# Altium PCB BB-18 Control Board.PcbDoc (part 1 of 2)
Units mil, origin at the board's own origin, x right, y up, seen from the top; angles counter-clockwise.
Board outline 5999.87 x 5500 mil, 2 copper layers (Top Layer, Bottom Layer); 86 components, 72 nets, 393 pads, 7 vias.
Unrouted connection lines stored in the file: 230.
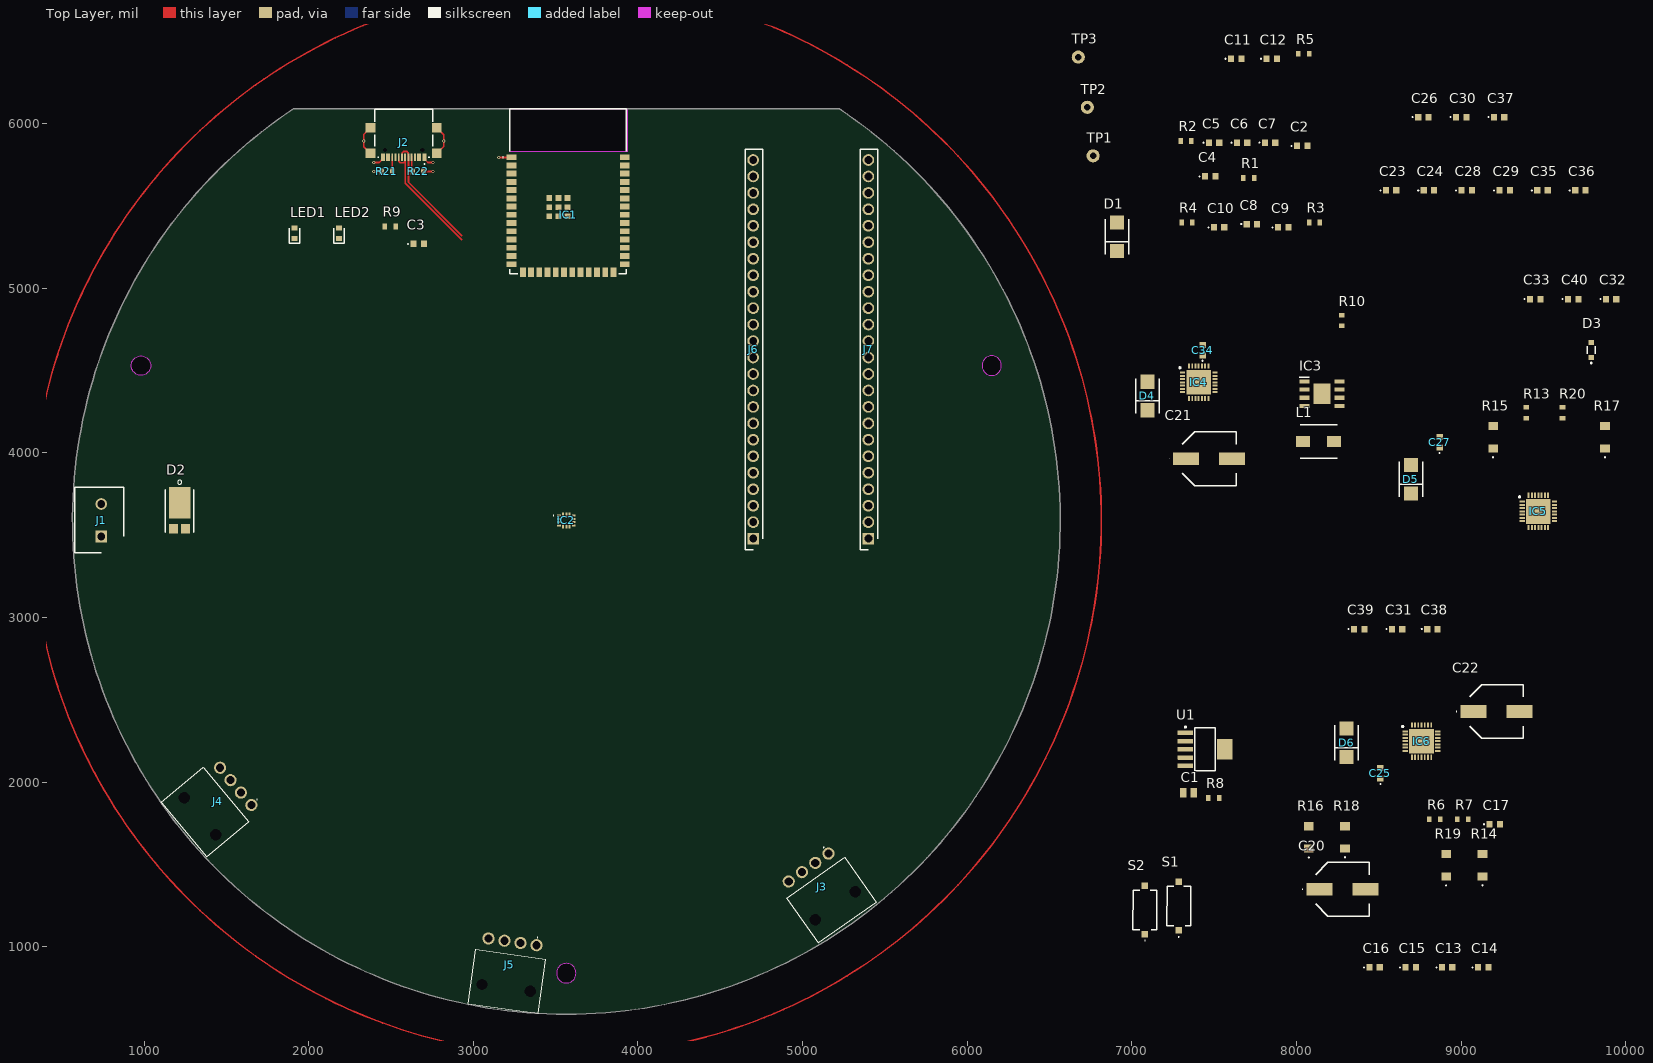
[diagram p0: Top Layer view]
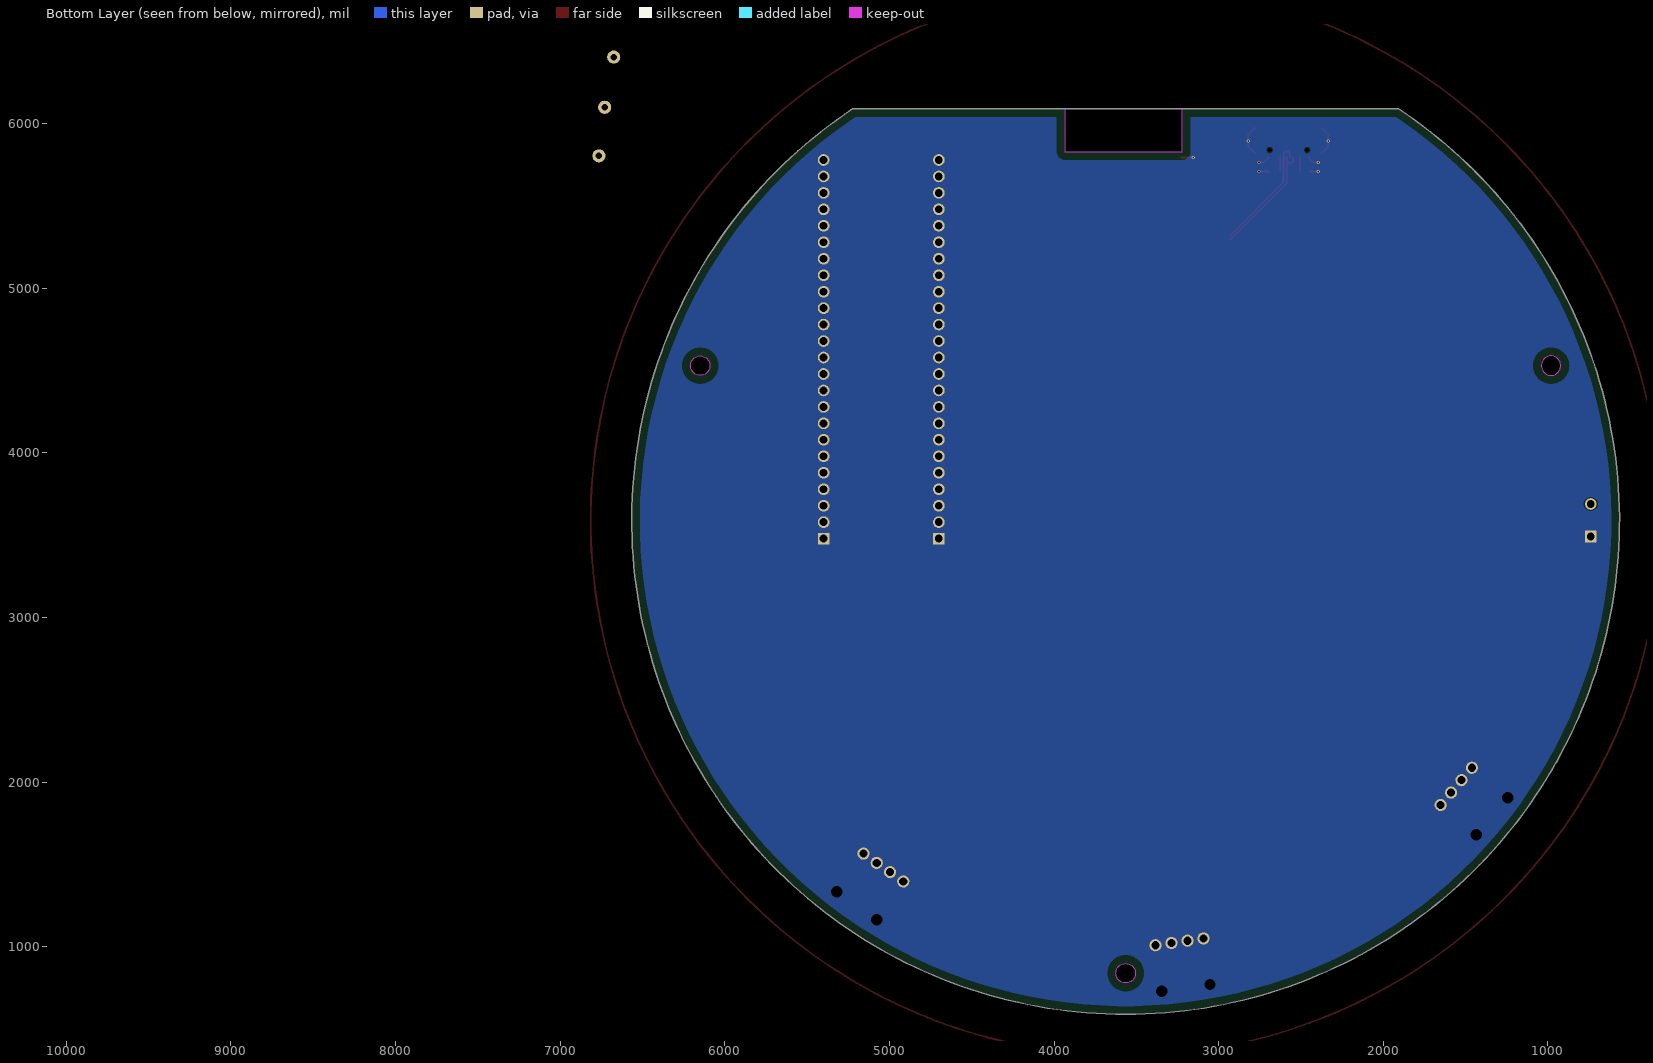
[diagram p1: Bottom Layer view, seen from below]

## Layer stack, top to bottom
Top Solder: solder mask 0.4, Solder Resist, Dk 3.5
Top Layer: signal copper 1.4
Dielectric 1: dielectric 12.6, FR-4, Dk 4.8
Bottom Layer: signal copper 1.4
Bottom Solder: solder mask 0.4, Solder Resist, Dk 3.5

## Board outline
1906.94,6090.25 ccw(c3565.25,3590.25) 5223.56,6090.25
cut-out: 6090.35,4530.81 ccw(c6149.4,4530.81) 6149.4,4471.75 ccw(c6149.4,4530.81) 6208.46,4530.81 ccw(c6149.4,4530.81) 6149.4,4589.86 ccw(c6149.4,4530.81)
cut-out: 3506.19,840.25 ccw(c3565.25,840.25) 3565.25,781.19 ccw(c3565.25,840.25) 3624.31,840.25 ccw(c3565.25,840.25) 3565.25,899.31 ccw(c3565.25,840.25)
cut-out: 981.1,4471.75 cw(c981.1,4530.81) 922.04,4530.81 cw(c981.1,4530.81) 981.1,4589.86 cw(c981.1,4530.81) 1040.15,4530.81 cw(c981.1,4530.81)
cut-out: 3220,5830 3220,6090 3935,6090 3935,5830

## Design rules (kind name [scope] priority, off if disabled: settings)
BoardOutlineClearance [All] p1: gap=50 ignorepadtopadclearanceinfootprint=FALSE except(0: Arc-OutlineEdge Track-OutlineEdge Text-OutlineEdge; 20: SMDPad-OutlineEdge THPad-OutlineEdge Via-OutlineEdge Fill-OutlineEdge Region-OutlineEdge)
Clearance [All] p1: gap=6 ignorepadtopadclearanceinfootprint=FALSE
DiffPairsRouting [All] p1: maxlimit=8 minlimit=8 mostfreqgap=8 toplayer_minwidth=8 toplayer_maxwidth=15 toplayer_prefwidth=15 bottomlayer_minwidth=8 bottomlayer_maxwidth=15 bottomlayer_prefwidth=15 maxuncoupledlength=500
HoleSize [All] p1: absolutevalues=TRUE maxlimit=500 minlimit=10 maxpercent=80.000 minpercent=20.000
MinimumAnnularRing [All] p1: minimumring=5
MinimumSolderMaskSliver [All] p1 off: minsoldermaskwidth=10
NetAntennae NetAntennae_MountingHoles [IsVia And InComponent('M*')] p1: netantennaetolerance=-1
NetAntennae [All] p2: netantennaetolerance=0
PlaneConnect [All] p1: planeconnectstyle=Direct reliefexpansion=20 reliefentries=4 reliefconductorwidth=10 reliefairgap=10
PolygonConnect PolygonConnect_Relief [IsPad and not (InComponent('M*'))] p1: connectstyle=Direct reliefconductorwidth=10 reliefentries=4 polygonreliefangle="90 Angle" airgapwidth=10
PolygonConnect PolygonConnect_Direct [All] p2: connectstyle=Direct reliefconductorwidth=10 reliefentries=4 polygonreliefangle="90 Angle" airgapwidth=10
RoutingVias [All] p1: holewidth=16 width=32 viastyle="Through Hole" minholewidth=10 minwidth=20 maxholewidth=100 maxwidth=200
ShortCircuit "Mounting Hole Exception" [IsVia And InComponent('M*') vs InComponent('M*')] p1: allowed=TRUE
ShortCircuit [All] p2: allowed=FALSE
SilkToSilkClearance [All] p1 off: silktosilkclearance=10
SilkToSolderMaskClearance [IsPad] p1 off: minsilkscreentomaskgap=10 clearancetoexposedcopper=TRUE
SolderMaskExpansion SolderMaskExpansion_via [IsVia] p1: expansion=4 istentingtop=TRUE
SolderMaskExpansion [All] p2: expansion=2 istentingtop=FALSE
Width [All] p1: maxlimit=500 minlimit=6 preferedwidth=10 minimp=50.000000 maximp=50.000000 favimp=50.000000
22 further rules are at their usual default settings.

## Classes and differential pairs
component class "Motor Driver": C20 C21 C22 C23 C24 C25 C26 C27 C28 C29 C30 C31 C32 C33 C34 C35 C36 C37 C38 C39 C40 D4 D5 D6 IC4 IC5 IC6 R15 R16 R17 R18 R19 R20
component class "Power Supplies": C11 C12 C13 C14 C15 C16 C17 D1 D2 IC3 L1 R13 R14 U1
component class MCU: C1 C2 C3 C4 C5 C6 C7 C8 C9 C10 IC1 IC2 R2 R3 R4 R5 R6 R7 R8 R10 S1 S2
component class Interface: D3 J1 J2 J3 J4 J5 J6 J7 LED1 LED2 R1 R9 R21 R22 TP1 TP2 TP3

## Components (designator, comment, footprint, x,y, rotation, side; value= is the part's Value field where it differs from the comment)
C1 "CL21A226MAQNNNE" CAP-0805 7345,1935 r0 top
C2 "CC0603KRX7R9BB104" CAP-0603 8035,5865 r0 top
C3 "CL10A105KB8NNNC" CAP-0603 2668.5,5270 r0 top
C4 "CC0603KRX7R9BB104" CAP-0603 7476.5,5680 r0 top
C5 "CL10C100JB8NNNC" CAP-0603 7500,5885 r0 top
C6 "CL10C100JB8NNNC" CAP-0603 7670,5885 r0 top
C7 "CC0603KRX7R9BB104" CAP-0603 7840,5885 r0 top
C8 "CL10A105KB8NNNC" CAP-0603 7730,5390 r0 top
C9 "CC0603KRX7R9BB104" CAP-0603 7920,5370 r0 top
C10 "CL10A105KB8NNNC" CAP-0603 7530,5370 r0 top
C11 "CL10B474KA8NNNC" CAP-0603 7635,6395 r0 top
C12 "10uF" CAP-0603 7850,6395 r0 top
C13 "CL10C470JB8NNNC" CAP-0603 8915,875 r0 top
C14 "100uF" CAP-0603 9135,875 r0 top
C15 "CL10A225KO8NNNC" CAP-0603 8695,875 r0 top
C16 "10uF" CAP-0603 8475,875 r0 top
C17 "10uF" CAP-0603 9205,1745 r0 top
C20 "150uF" EEHZA1H680P 8280,1350 r0 top
C21 "150uF" EEHZA1H680P 7470,3965 r0 top
C22 "150uF" EEHZA1H680P 9215,2430 r0 top
C23 "CC0603KRX7R9BB104" CAP-0603 8575,5595 r0 top
C24 "CC0603KRX7R9BB104" CAP-0603 8805,5595 r0 top
C25 "CC0603KRX7R9BB104" CAP-0603 8510,2055 r90 top
C26 "CC0603KRX7R9BB104" CAP-0603 8771.5,6040 r0 top
C27 "CC0603KRX7R9BB104" CAP-0603 8870,4065 r90 top
C28 "CC0603KRX7R9BB104" CAP-0603 9035,5595 r0 top
C29 "CC0603KRX7R9BB104" CAP-0603 9265,5595 r0 top
C30 "CC0603KRX7R9BB104" CAP-0603 9001.5,6040 r0 top
C31 "CC0603KRX7R9BB104" CAP-0603 8611.5,2930 r0 top
C32 "CL10B223KB8NNNC" CAP-0603 9911.5,4935 r0 top
C33 "CL10B223KB8NNNC" CAP-0603 9451.5,4935 r0 top
C34 "CL10B223KB8NNNC" CAP-0603 7430,4625 r90 top
C35 "CC0603KRX7R9BB104" CAP-0603 9495,5595 r0 top
C36 "CC0603KRX7R9BB104" CAP-0603 9725,5595 r0 top
C37 "CC0603KRX7R9BB104" CAP-0603 9231.5,6040 r0 top
C38 "CL10A475KO8NNNC" CAP-0603 8826.5,2930 r0 top
C39 "CL10A475KO8NNNC" CAP-0603 8381.5,2930 r0 top
C40 "CL10A475KO8NNNC" CAP-0603 9681.5,4935 r0 top
D1 "SS24FL" SMBJ12A 6910,5313.39 r90 top
D2 "SMBJ22A" SBRT15U50SP5-13 1216.22,3696.77 r0 top
D3 "CUS05S40,H3F" CUZ10V 9791.5,4625 r0 top
D4 "SMBJ22A" SMBJ12A 7095,4346.61 r90 top
D5 "SMBJ22A" SMBJ12A 8695,3840 r90 top
D6 "SMBJ22A" SMBJ12A 8305,2240 r90 top
IC1 "ESP32-S3-WROOM-1-N4" ESP32S3WROOM1N4 3576.05,5580 r0 top
IC2 "LSM6DSV16BXTR" LSM6DSV16BXTR 3565,3590 r0 top
IC3 "LMR23630AFDDAR" SOIC127P600X170-9N 8155,4360 r0 top
IC4 "TMC2209-LA-T" QFN50P500X500X90-29N-D 7406.57,4429.37 r0 top
IC5 "TMC2209-LA-T" QFN50P500X500X90-29N-D 9470,3645 r0 top
IC6 "TMC2209-LA-T" QFN50P500X500X90-29N-D 8760,2250 r0 top
J1 "691137710002" SHDR2W70P0X500_1X2_1000X750X1150P 740,3493.15 r90 top
J2 "GSB1C41110SSHR" GSB1C41110SSHR 2576.57,5931.1 r180 top
J3 "105313-1104" 1053131104 5157.86,1566.56 r35 top
J4 "105313-1104" 1053131104 1651.54,1861.7 r310 top
J5 "105313-1104" 1053131104 3384.34,1009.93 r352 top
J6 "SSK02-FPH-254-A24" RHDR24W69P0X254_1X24_6146X250X870P 4700,3480 r90 top
J7 "SSK02-FPH-254-A24" RHDR24W69P0X254_1X24_6146X250X870P 5400,3480 r90 top
L1 "10uH" INDPM5752X300N 8135,4070 r0 top
LED1 "LTST-C193TBKT-5A" LEDC1608X45N 1915,5335 r90 top
LED2 "LTST-C193TBKT-5A" LEDC1608X45N 2185,5335 r90 top
R1 "0603WAF2000T5E" RES-0603 7710,5670 r0 top
R2 "0603WAF1002T5E" RES-0603 7330,5895 r0 top
R3 "0603WAF1002T5E" RES-0603 8110,5400 r0 top
R4 "0603WAF1001T5E" RES-0603 7335,5400 r0 top
R5 "0603WAF1002T5E" RES-0603 8045,6425 r0 top
R6 "0603WAF220JT5E" RES-0603 8840,1775 r0 top
R7 "0603WAF220JT5E" RES-0603 9010,1775 r0 top
R8 "0603WAF2201T5E" RES-0603 7497.44,1905 r0 top
R9 "0603WAF1001T5E" RES-0603 2495,5375 r0 top
R10 "0603WAF2201T5E" RES-0603 8275,4805 r90 top
R13 "6.9kΩ 0.1%" RES-0603 9396.5,4245 r90 top
R14 "3.97kΩ 0.1%" ERJ8_B_BW_R_LW_CW_D 9130,1495 r90 top
R15 "220mΩ" ERJ8_B_BW_R_LW_CW_D 9195,4095 r90 top
R16 "220mΩ" ERJ8_B_BW_R_LW_CW_D 8075,1665 r90 top
R17 "220mΩ" ERJ8_B_BW_R_LW_CW_D 9875,4095 r90 top
R18 "220mΩ" ERJ8_B_BW_R_LW_CW_D 8295,1665 r90 top
R19 "220mΩ" ERJ8_B_BW_R_LW_CW_D 8910,1495 r90 top
R20 "220mΩ" RES-0603 9616.5,4245 r90 top
R21 "0603WAF5101T5E" RES-0603 2475,5710 r180 top
R22 "0603WAF5101T5E" RES-0603 2665,5710 r180 top
S1 "TS09-63-25-WT-260-SMT-TR" TS096325WT260SMTTR 7285,1247.64 r90 top
S2 "TS09-63-25-WT-260-SMT-TR" TS096325WT260SMTTR 7080,1225 r90 top
TP1 "Test Point Loop" "Test Point Loop - Black" 6765,5805 r90 top
TP2 "Test Point Loop" "Test Point Loop - Black" 6730,6100 r90 top
TP3 "Test Point Loop" "Test Point Loop - Black" 6675,6405 r90 top
U1 "TL1963ADCQR" DCQ0006A_M 7445,2200 r0 top

## Footprints (in the part's own frame and the unit in brackets; to place one, negate y for a bottom-side part, rotate by r counter-clockwise, add the part's x,y. Pads: shape width x height; smd on the part's side, far side on the other; paste and mask are expansions set on the pad)
1053131104 [mm]
  round 1.875 hole 1.25: 1(0,0) 2(-2.5,0) 3(-5,0) 4(-7.5,0)
  round 0.875 hole 1.75 unplated: MH1(0,-7.18) MH2(-7.5,-7.18)
  silkscreen extent -9.22,-10.38 1.72,1.27, body extent -9.22,-11.79 1.72,0.37, height 6.5
CAP-0603 [mm]
  rect 0.95x1 smd: 1(-0.8,0) 2(0.8,0)
  silkscreen extent -1.7,-0.05 -1.6,0.05, body extent -0.87,-0.48 0.88,0.47, height 0.87
CAP-0805 [mm]
  rect 1.02x1.47 smd: 1(-0.8,0) 2(0.8,0)
  body extent -1.1,-0.73 1.1,0.72, height 1.1
CUZ10V [mm]
  rect 0.9x0.8 smd: 1(0,-1.15) 2(0,1.15)
  silkscreen extent -0.63,-2.1 0.63,0.6, body extent -0.63,-1.25 0.63,1.25, height 0.9
DCQ0006A_M [mm] "SOT223, 6-Leads, Body 6.55x3.55mm, Pitch 1.27mm, IPC Low Density"
  rrect14% 2.4x0.7 smd: 1(-3.025,2.54) 2(-3.025,1.27) 3(-3.025,0) 4(-3.025,-1.27) 5(-3.025,-2.54)
  rrect4% 2.4x3.2 smd: 6(3.025,0)
  silkscreen extent -3.15,-3.3 1.55,3.56, body extent -3.48,-3.25 3.48,3.25, height 1.64
EEHZA1H680P [mm]
  rect 4x2 smd: 1(-3.55,0) 2(3.55,0)
  silkscreen extent -6.18,-4.15 4.15,4.15, body extent -4.85,-4.15 4.85,4.15, height 10.23
ERJ8_B_BW_R_LW_CW_D [mm]
  rect 1.25x1.5 smd: 1(-1.725,0) 2(1.725,0)
  silkscreen extent -3.12,-0.05 -3.03,0.05, body extent -1.6,-0.8 1.6,0.8, height 0.6
ESP32S3WROOM1N4 [mm]
  rect 1.5x0.9 smd: 1(-8.75,5.51) 2(-8.75,4.24) 3(-8.75,2.97) 4(-8.75,1.7) 5(-8.75,0.43) 6(-8.75,-0.84) 7(-8.75,-2.11) 8(-8.75,-3.38) 9(-8.75,-4.65) 10(-8.75,-5.92) 11(-8.75,-7.19) 12(-8.75,-8.46) 13(-8.75,-9.73) 14(-8.75,-11) 27(8.75,-11) 28(8.75,-9.73) 29(8.75,-8.46) 30(8.75,-7.19) 31(8.75,-5.92) 32(8.75,-4.65) 33(8.75,-3.38) 34(8.75,-2.11) 35(8.75,-0.84) 36(8.75,0.43) 37(8.75,1.7) 38(8.75,2.97) 39(8.75,4.24) 40(8.75,5.51)
  rect 0.9x1.5 smd: 15(-6.985,-12.25) 16(-5.715,-12.25) 17(-4.445,-12.25) 18(-3.175,-12.25) 19(-1.905,-12.25) 20(-0.635,-12.25) 21(0.635,-12.25) 22(1.905,-12.25) 23(3.175,-12.25) 24(4.445,-12.25) 25(5.715,-12.25) 26(6.985,-12.25)
  rect 0.9x0.9 smd: 41(-1.5,-2.21) 42(-0.1,-2.21) 43(-0.1,-0.81) 44(-1.5,-0.81) 45(-2.9,-0.81) 46(-2.9,-2.21) 47(-2.9,-3.61) 48(-1.5,-3.61) 49(-0.1,-3.61)
  silkscreen extent -10.1,-12.5 9,13, body extent -9,-12.5 9,13, height 3.25
GSB1C41110SSHR [mm]
  rect 0.6x1.15 smd: A1(-3.2,3.39) A4(-2.4,3.39) A9(2.4,3.39) A12(3.2,3.39)
  rect 0.3x1.15 smd: A5(-1.25,3.39) A6(-0.25,3.39) A7(0.25,3.39) A8(1.25,3.39) B5(1.75,3.39) B6(0.75,3.39) B7(-0.75,3.39) B8(-1.75,3.39)
  round 0.325 hole 0.65 unplated: MH1(-2.89,2.315) MH2(2.89,2.315)
  rect 1.5x1.5 smd: MP1(-5.12,2.815) MP2(5.12,2.815) MP3(-5.12,-1.115) MP4(5.12,-1.115)
  silkscreen extent -4.47,-3.97 4.47,4.5, body extent -5.67,-4.09 5.67,3.51, height 3.12
INDPM5752X300N [mm]
  rect 2.15x1.7 smd: 1(-2.4,0) 2(2.4,0)
  silkscreen extent -2.85,-2.6 2.85,2.6, body extent -2.85,-2.6 2.85,2.6, height 2.81
LEDC1608X45N [mm]
  rect 0.8x0.95 smd: 1(-0.8,0.025) 2(0.8,0.025)
  silkscreen extent -1.55,-0.8 0.8,0.85, body extent -0.8,-0.38 0.8,0.43, height 0.45
LSM6DSV16BXTR [mm]
  rect 0.6x0.3 smd: 1(-1.15,0.75) 2(-1.15,0.25) 3(-1.15,-0.25) 4(-1.15,-0.75) 8(1.15,-0.75) 9(1.15,-0.25) 10(1.15,0.25) 11(1.15,0.75)
  rect 0.3x0.6 smd: 5(-0.5,-0.9) 6(0,-0.9) 7(0.5,-0.9) 12(0.5,0.9) 13(0,0.9) 14(-0.5,0.9)
  silkscreen extent -2,0.7 -1.9,0.8, body extent -1.5,-1.25 1.5,1.25, height 0.74
QFN50P500X500X90-29N-D [mm]
  rect 0.8x0.3 smd: 1(-2.5,1.5) 2(-2.5,1) 3(-2.5,0.5) 4(-2.5,0) 5(-2.5,-0.5) 6(-2.5,-1) 7(-2.5,-1.5) 15(2.5,-1.5) 16(2.5,-1) 17(2.5,-0.5) 18(2.5,0) 19(2.5,0.5) 20(2.5,1) 21(2.5,1.5)
  rect 0.3x0.8 smd: 8(-1.5,-2.5) 9(-1,-2.5) 10(-0.5,-2.5) 11(0,-2.5) 12(0.5,-2.5) 13(1,-2.5) 14(1.5,-2.5) 22(1.5,2.5) 23(1,2.5) 24(0.5,2.5) 25(0,2.5) 26(-0.5,2.5) 27(-1,2.5) 28(-1.5,2.5)
  rect 3.8x3.8 smd: 29(0,0)
  silkscreen extent -3.02,2.13 -2.77,2.37, body extent -2.55,-2.55 2.55,2.55, height 0.9
RES-0603 [mm] "Resistor, Yageo RC_L, SM0603, IPC Medium Density"
  rect 0.7x0.9 smd: 1(-0.827,0) 2(0.827,0)
  body extent -0.85,-0.45 0.85,0.45, height 0.55
RHDR24W69P0X254_1X24_6146X250X870P [mm]
  rect 1.8x1.8 hole 1.2: 1(0,0)
  round 1.8 hole 1.2: 2(2.54,0) 3(5.08,0) 4(7.62,0) 5(10.16,0) 6(12.7,0) 7(15.24,0) 8(17.78,0) 9(20.32,0) 10(22.86,0) 11(25.4,0) 12(27.94,0) 13(30.48,0) 14(33.02,0) 15(35.56,0) 16(38.1,0) 17(40.64,0) 18(43.18,0) 19(45.72,0) 20(48.26,0) 21(50.8,0) 22(53.34,0) 23(55.88,0) 24(58.42,0)
  silkscreen extent -1.72,-1.45 60.09,1.25, body extent -1.52,-1.25 59.94,1.25, height 8.7
SBRT15U50SP5-13 [mm]
  rect 1.39x1.4 smd: 1(-0.92,-3.982) 1(0.92,-3.982)
  rect 3.36x4.86 smd: 2(0,0)
  silkscreen extent -2.2,-4.5 2.2,3.52, body extent -2,-4.6 2,2.4, height 1.05
SHDR2W70P0X500_1X2_1000X750X1150P [mm]
  rect 1.8x1.8 hole 1.2: 1(0,0)
  round 1.8 hole 1.2: 2(5,0)
  silkscreen extent -2.5,-3.5 7.6,4.1, body extent -2.45,-3.45 7.55,4.05, height 11.5
SMBJ12A [mm]
  rect 2.2x2.15 smd: 1(-2.2,0) 2(2.2,0)
  silkscreen extent -2.68,-1.81 2.68,1.81, body extent -2.68,-1.86 2.68,1.86, height 2.33
SOIC127P600X170-9N [mm]
  rect 1.525x0.65 smd: 1(-2.712,1.905) 2(-2.712,0.635) 3(-2.712,-0.635) 4(-2.712,-1.905) 5(2.712,-1.905) 6(2.712,-0.635) 7(2.712,0.635) 8(2.712,1.905)
  rect 2.6x3.1 smd: 9(0,0)
  silkscreen extent -3.47,2.58 -1.95,2.58, body extent -3.01,-2.45 3.01,2.45, height 1.57
"Test Point Loop - Black" [mil] ", black"
  round 80 hole 40: 1(0,0)
  body extent -50,-50 50,50, height 180
TS096325WT260SMTTR [mm]
  rect 1x1 smd: 1(-3.75,0) 2(3.75,0)
  silkscreen extent -4.8,-1.85 3.05,1.85, body extent -4.05,-1.85 4.05,1.85, height 2.5

## Part data
C1: "Capacitor, Ceramic (MLCC), 22uF, ±20%, 25V, X5R, ±20%, SMD 0805", Capacitance=22uF, Capacitance @ 1.2V DC Bias=19.563uF, Capacitance @ 1.5V DC Bias=18.822uF, Capacitance @ 1.8V DC Bias=18.030uF, Capacitance @ 1.35V DC Bias=19.202uF, Capacitance @ 1V DC Bias=19.999uF, Capacitance @ 2.5V DC Bias=16.029uF, Capacitance @ 3.3V DC Bias=13.689uF, Capacitance @ 3.7V DC Bias=12.636uF, Capacitance @ 4.2V DC Bias=11.463uF, Capacitance @ 5V DC Bias=9.846uF, Capacitance @ 9V DC Bias=5.133uF, Capacitance @ 12V DC Bias=3.756uF, Capacitance @ 15V DC Bias=2.756uF, Capacitance @ 24V DC Bias=1.578uF, JLCPCB Basic Part=Yes, JLCPCB Part Number=C45783, Manufacturer="Samsung Electro-Mechanics", Package Size=0805, Temperature Coefficient=X5R, Temperature Rating="-55°C ~ 85°C", Tolerance=±20%, Voltage Rating=25V, Category="Capacitors - MLCC", ComponentLink1Description=Datasheet, ComponentLink1URL=https://wmsc.lcsc.com/wmsc/upload/file/pdf/v2/lcsc/2304140030_Samsung-Electro-Mechanics-CL21A226MAQNNNE_C45783.pdf, ComponentLink2Description="JLCPCB Part URL", ComponentLink2URL=https://jlcpcb.com/partdetail/C45783, ComponentLink3Description="LCSC Part URL", ComponentLink3URL=https://lcsc.com/product-detail/Multilayer-Ceramic-Capacitors-MLCC---SMD-SMT_Samsung-Electro-Mechanics-Samsung-Electro-Mechanics-CL21A226MAQNNNE_C45783.html, ComponentLink4Description="Samsung Component Library", ComponentLink4URL=https://weblib.samsungsem.com/mlcc/mlcc-ec.do?partNumber=CL21A226MAQNNN, Impedance (0V Bias) @ 1GHz=0.811Ω, Impedance (0V Bias) @ 1kHz=9.64Ω, Impedance (0V Bias) @ 1MHz=0.00657Ω, Impedance (0V Bias) @ 2GHz=1.87Ω, Impedance (0V Bias) @ 5GHz=2.42Ω, Impedance (0V Bias) @ 5kHz=1.97Ω, Impedance (0V Bias) @ 5MHz=0.0137Ω, Impedance (0V Bias) @ 10kHz=0.992Ω, Impedance (0V Bias) @ 10MHz=0.0227Ω, Impedance (0V Bias) @ 50kHz=0.203Ω, Impedance (0V Bias) @ 50MHz=0.0786Ω, Impedance (0V Bias) @ 100Hz=93.6Ω, Impedance (0V Bias) @ 100kHz=0.102Ω, Impedance (0V Bias) @ 100MHz=0.138Ω, Impedance (0V Bias) @ 500Hz=19.1Ω, Impedance (0V Bias) @ 500kHz=0.0188Ω, Impedance (0V Bias) @ 500MHz=0.487Ω, Impedance (25V Bias) @ 1GHz=0.864Ω, Impedance (25V Bias) @ 1kHz=110Ω, Impedance (25V Bias) @ 1MHz=0.101Ω, Impedance (25V Bias) @ 2GHz=1.78Ω, Impedance (25V Bias) @ 5GHz=2.43Ω, Impedance (25V Bias) @ 5kHz=22.1Ω, Impedance (25V Bias) @ 5MHz=0.008Ω, Impedance (25V Bias) @ 10kHz=11Ω, Impedance (25V Bias) @ 10MHz=0.0343Ω, Impedance (25V Bias) @ 50kHz=2.22Ω, Impedance (25V Bias) @ 50MHz=0.0782Ω, Impedance (25V Bias) @ 100Hz=1.09E+03Ω, Impedance (25V Bias) @ 100kHz=1.11Ω, Impedance (25V Bias) @ 100MHz=0.136Ω, Impedance (25V Bias) @ 500Hz=219Ω, Impedance (25V Bias) @ 500kHz=0.22Ω, Impedance (25V Bias) @ 500MHz=0.528Ω, Manufacturer Part Number=CL21A226MAQNNNE, RoHS=Yes, Supplier 1=LCSC, Supplier Part Number 1=C45783
C2 C4 C7 C9 C23 C24 C25 C26 C27 C28 C29 C30 C31 C35 C36 C37: "Capacitor, Ceramic (MLCC), 100nF, ±10%, 50V, X7R, ±10%, SMD 0603", Capacitance=100nF, JLCPCB Basic Part=Yes, JLCPCB Part Number=C14663, Manufacturer=YAGEO, Package Size=0603, Temperature Coefficient=X7R, Tolerance=±10%, Voltage Rating=50V, Category="Capacitors - MLCC", ComponentLink1Description=Datasheet, ComponentLink1URL=https://wmsc.lcsc.com/wmsc/upload/file/pdf/v2/lcsc/2211101700_YAGEO-CC0603KRX7R9BB104_C14663.pdf, ComponentLink2Description="JLCPCB Part URL", ComponentLink2URL=https://jlcpcb.com/partdetail/C14663, ComponentLink3Description="LCSC Part URL", ComponentLink3URL=https://lcsc.com/product-detail/Multilayer-Ceramic-Capacitors-MLCC---SMD-SMT_YAGEO-YAGEO-CC0603KRX7R9BB104_C14663.html, Manufacturer Part Number=CC0603KRX7R9BB104, RoHS=Yes, Supplier 1=LCSC, Supplier Part Number 1=C14663
C3 C8 C10: "Capacitor, Ceramic (MLCC), 1uF, ±10%, 50V, X5R, ±10%, SMD 0603", Capacitance=1uF, Capacitance @ 1.2V DC Bias=1.044uF, Capacitance @ 1.5V DC Bias=1.027uF, Capacitance @ 1.8V DC Bias=1.007uF, Capacitance @ 1.35V DC Bias=1.035uF, Capacitance @ 1V DC Bias=1.054uF, Capacitance @ 2.5V DC Bias=0.947uF, Capacitance @ 3.3V DC Bias=0.865uF, Capacitance @ 3.7V DC Bias=0.824uF, Capacitance @ 4.2V DC Bias=0.773uF, Capacitance @ 5V DC Bias=0.695uF, Capacitance @ 9V DC Bias=0.410uF, Capacitance @ 12V DC Bias=0.308uF, Capacitance @ 15V DC Bias=0.231uF, Capacitance @ 24V DC Bias=0.130uF, Capacitance @ 36V DC Bias=0.080uF, Capacitance @ 48V DC Bias=0.063uF, JLCPCB Basic Part=Yes, JLCPCB Part Number=C15849, Manufacturer="Samsung Electro-Mechanics", Package Size=0603, Temperature Coefficient=X5R, Temperature Rating="-55°C ~ 85°C", Tolerance=±10%, Voltage Rating=50V, Category="Capacitors - MLCC", ComponentLink1Description=Datasheet, ComponentLink1URL=https://wmsc.lcsc.com/wmsc/upload/file/pdf/v2/lcsc/2304140030_Samsung-Electro-Mechanics-CL10A105KB8NNNC_C15849.pdf, ComponentLink2Description="JLCPCB Part URL", ComponentLink2URL=https://jlcpcb.com/partdetail/C15849, ComponentLink3Description="LCSC Part URL", ComponentLink3URL=https://lcsc.com/product-detail/Multilayer-Ceramic-Capacitors-MLCC---SMD-SMT_Samsung-Electro-Mechanics-Samsung-Electro-Mechanics-CL10A105KB8NNNC_C15849.html, ComponentLink4Description="Samsung Component Library", ComponentLink4URL=https://weblib.samsungsem.com/mlcc/mlcc-ec.do?partNumber=CL10A105KB8NNN, Impedance (0V Bias) @ 1GHz=0.988Ω, Impedance (0V Bias) @ 1kHz=191Ω, Impedance (0V Bias) @ 1MHz=0.208Ω, Impedance (0V Bias) @ 2GHz=2.38Ω, Impedance (0V Bias) @ 5GHz=4.94Ω, Impedance (0V Bias) @ 5kHz=39.1Ω, Impedance (0V Bias) @ 5MHz=0.0293Ω, Impedance (0V Bias) @ 10kHz=19.8Ω, Impedance (0V Bias) @ 10MHz=0.0159Ω, Impedance (0V Bias) @ 50kHz=4.04Ω, Impedance (0V Bias) @ 50MHz=0.0822Ω, Impedance (0V Bias) @ 100Hz=1.84E+03Ω, Impedance (0V Bias) @ 100kHz=2.04Ω, Impedance (0V Bias) @ 100MHz=0.14Ω, Impedance (0V Bias) @ 500Hz=378Ω, Impedance (0V Bias) @ 500kHz=0.416Ω, Impedance (0V Bias) @ 500MHz=0.54Ω, Manufacturer Part Number=CL10A105KB8NNNC, RoHS=Yes, Supplier 1=LCSC, Supplier Part Number 1=C15849
C5 C6: "Capacitor, Ceramic (MLCC), 10pF, ±5%, 50V, C0G, ±5%, SMD 0603", Capacitance=10pF, JLCPCB Basic Part=Yes, JLCPCB Part Number=C1634, Manufacturer="Samsung Electro-Mechanics", Package Size=0603, Temperature Coefficient=C0G, Temperature Rating="-55°C ~ 125°C", Tolerance=±5%, Voltage Rating=50V, Category="Capacitors - MLCC", ComponentLink1Description=Datasheet, ComponentLink1URL=https://wmsc.lcsc.com/wmsc/upload/file/pdf/v2/lcsc/2304140030_Samsung-Electro-Mechanics-CL10C100JB8NNNC_C1634.pdf, ComponentLink2Description="JLCPCB Part URL", ComponentLink2URL=https://jlcpcb.com/partdetail/C1634, ComponentLink3Description="LCSC Part URL", ComponentLink3URL=https://lcsc.com/product-detail/Multilayer-Ceramic-Capacitors-MLCC---SMD-SMT_Samsung-Electro-Mechanics-Samsung-Electro-Mechanics-CL10C100JB8NNNC_C1634.html, ComponentLink4Description="Samsung Component Library", ComponentLink4URL=https://weblib.samsungsem.com/mlcc/mlcc-ec.do?partNumber=CL10C100JB8NNN, Impedance (0V Bias) @ 1GHz=12.8Ω, Impedance (0V Bias) @ 2GHz=1.36Ω, Impedance (0V Bias) @ 5GHz=12.1Ω, Impedance (0V Bias) @ 100MHz=159Ω, Impedance (0V Bias) @ 500MHz=30.3Ω, Manufacturer Part Number=CL10C100JB8NNNC, RoHS=Yes, Supplier 1=LCSC, Supplier Part Number 1=C1634
C11: "Capacitor, Ceramic (MLCC), 470nF, ±10%, 25V, X7R, ±10%, SMD 0603", Capacitance=470nF, Capacitance @ 1.2V DC Bias=478.296nF, Capacitance @ 1.5V DC Bias=478.153nF, Capacitance @ 1.8V DC Bias=477.489nF, Capacitance @ 1.35V DC Bias=478.281nF, Capacitance @ 1V DC Bias=478.182nF, Capacitance @ 2.5V DC Bias=472.414nF, Capacitance @ 3.3V DC Bias=462.957nF, Capacitance @ 3.7V DC Bias=457.410nF, Capacitance @ 4.2V DC Bias=450.090nF, Capacitance @ 5V DC Bias=437.532nF, Capacitance @ 9V DC Bias=369.261nF, Capacitance @ 12V DC Bias=317.341nF, Capacitance @ 15V DC Bias=268.462nF, Capacitance @ 24V DC Bias=160.798nF, JLCPCB Basic Part=Yes, JLCPCB Part Number=C1623, Manufacturer="Samsung Electro-Mechanics", Package Size=0603, Temperature Coefficient=X7R, Temperature Rating="-55°C ~ 125°C", Tolerance=±10%, Voltage Rating=25V, Category="Capacitors - MLCC", ComponentLink1Description=Datasheet, ComponentLink1URL=https://wmsc.lcsc.com/wmsc/upload/file/pdf/v2/lcsc/2304140030_Samsung-Electro-Mechanics-CL10B474KA8NNNC_C1623.pdf, ComponentLink2Description="JLCPCB Part URL", ComponentLink2URL=https://jlcpcb.com/partdetail/C1623, ComponentLink3Description="LCSC Part URL", ComponentLink3URL=https://lcsc.com/product-detail/Multilayer-Ceramic-Capacitors-MLCC---SMD-SMT_Samsung-Electro-Mechanics-Samsung-Electro-Mechanics-CL10B474KA8NNNC_C1623.html, ComponentLink4Description="Samsung Component Library", ComponentLink4URL=https://weblib.samsungsem.com/mlcc/mlcc-ec.do?partNumber=CL10B474KA8NNN, Impedance (0V Bias) @ 1GHz=1.36Ω, Impedance (0V Bias) @ 1kHz=401Ω, Impedance (0V Bias) @ 1MHz=0.422Ω, Impedance (0V Bias) @ 2GHz=3.45Ω, Impedance (0V Bias) @ 5GHz=7.51Ω, Impedance (0V Bias) @ 5kHz=81.2Ω, Impedance (0V Bias) @ 5MHz=0.0719Ω, Impedance (0V Bias) @ 10kHz=40.9Ω, Impedance (0V Bias) @ 10MHz=0.0175Ω, Impedance (0V Bias) @ 50kHz=8.29Ω, Impedance (0V Bias) @ 50MHz=0.0949Ω, Impedance (0V Bias) @ 100Hz=3.92E+03Ω, Impedance (0V Bias) @ 100kHz=4.17Ω, Impedance (0V Bias) @ 100MHz=0.17Ω, Impedance (0V Bias) @ 500Hz=796Ω, Impedance (0V Bias) @ 500kHz=0.844Ω, Impedance (0V Bias) @ 500MHz=0.717Ω, Impedance (25V Bias) @ 1GHz=1.36Ω, Impedance (25V Bias) @ 1kHz=1.2E+03Ω, Impedance (25V Bias) @ 1MHz=1.22Ω, Impedance (25V Bias) @ 2GHz=3.41Ω, Impedance (25V Bias) @ 5GHz=7.6Ω, Impedance (25V Bias) @ 5kHz=242Ω, Impedance (25V Bias) @ 5MHz=0.256Ω, Impedance (25V Bias) @ 10kHz=121Ω, Impedance (25V Bias) @ 10MHz=0.109Ω, Impedance (25V Bias) @ 50kHz=24.5Ω, Impedance (25V Bias) @ 50MHz=0.11Ω, Impedance (25V Bias) @ 100Hz=1.18E+04Ω, Impedance (25V Bias) @ 100kHz=12.3Ω, Impedance (25V Bias) @ 100MHz=0.171Ω, Impedance (25V Bias) @ 500Hz=2.38E+03Ω, Impedance (25V Bias) @ 500kHz=2.47Ω, Impedance (25V Bias) @ 500MHz=0.718Ω, Manufacturer Part Number=CL10B474KA8NNNC, RoHS=Yes, Supplier 1=LCSC, Supplier Part Number 1=C1623
C12: library part CL32B106KBJNNNE, "CAP CER 10UF 50V X7R 1210", Manufacturer_Name=SAMSUNG, Mouser Part Number=187-CL32B106KBJNNNE, Arrow Part Number=CL32B106KBJNNNE, Arrow Price/Stock=https://www.arrow.com/en/products/cl32b106kbjnnne/samsung-electro-mechanics.html?utm_currency=USD&region=nac, Datasheet Link=https://datasheet.datasheetarchive.com/originals/distributors/Datasheets-DGA10/2406903.pdf, Height=2.7mm, Manufacturer_Part_Number=CL32B106KBJNNNE, Mouser Price/Stock=https://www.mouser.co.uk/ProductDetail/Samsung-Electro-Mechanics/CL32B106KBJNNNE?qs=349EhDEZ59rXK%2FOM74I5cg%3D%3D
C13: "Capacitor, Ceramic (MLCC), 47pF, ±5%, 50V, C0G, ±5%, SMD 0603", Capacitance=47pF, JLCPCB Basic Part=Yes, JLCPCB Part Number=C1671, Manufacturer="Samsung Electro-Mechanics", Package Size=0603, Temperature Coefficient=C0G, Temperature Rating="-55°C ~ 125°C", Tolerance=±5%, Voltage Rating=50V, Category="Capacitors - MLCC", ComponentLink1Description=Datasheet, ComponentLink1URL=https://wmsc.lcsc.com/wmsc/upload/file/pdf/v2/lcsc/2304140030_Samsung-Electro-Mechanics-CL10C470JB8NNNC_C1671.pdf, ComponentLink2Description="JLCPCB Part URL", ComponentLink2URL=https://jlcpcb.com/partdetail/C1671, ComponentLink3Description="LCSC Part URL", ComponentLink3URL=https://lcsc.com/product-detail/Multilayer-Ceramic-Capacitors-MLCC---SMD-SMT_Samsung-Electro-Mechanics-Samsung-Electro-Mechanics-CL10C470JB8NNNC_C1671.html, ComponentLink4Description="Samsung Component Library", ComponentLink4URL=https://weblib.samsungsem.com/mlcc/mlcc-ec.do?partNumber=CL10C470JB8NNN, Impedance (0V Bias) @ 1GHz=0.296Ω, Impedance (0V Bias) @ 2GHz=7.28Ω, Impedance (0V Bias) @ 5GHz=16.2Ω, Impedance (0V Bias) @ 100MHz=33.5Ω, Impedance (0V Bias) @ 500MHz=4.98Ω, Manufacturer Part Number=CL10C470JB8NNNC, RoHS=Yes, Supplier 1=LCSC, Supplier Part Number 1=C1671
C14: library part 1210YD107MAT2A, "CAP CER 100UF 16V X5R 1210", Manufacturer_Name="Kyocera AVX", Mouser Part Number=581-1210YD107MAT2A, Arrow Part Number=1210YD107MAT2A, Arrow Price/Stock=https://www.arrow.com/en/products/1210yd107mat2a/avx.html?utm_currency=USD&region=asia, Datasheet Link=https://datasheet.datasheetarchive.com/originals/distributors/DKDS40/DSANUWW008853.pdf, Height=2.79mm, Manufacturer_Part_Number=1210YD107MAT2A, Mouser Price/Stock=https://www.mouser.co.uk/ProductDetail/KYOCERA-AVX/1210YD107MAT2A?qs=dTuOkNN7mNJArH0RUYK6ig%3D%3D
C15: "Capacitor, Ceramic (MLCC), 2.2uF, ±10%, 16V, X5R, ±10%, SMD 0603", Capacitance=2.2uF, Capacitance @ 1.2V DC Bias=2.232uF, Capacitance @ 1.5V DC Bias=2.135uF, Capacitance @ 1.8V DC Bias=2.033uF, Capacitance @ 1.35V DC Bias=2.184uF, Capacitance @ 1V DC Bias=2.290uF, Capacitance @ 2.5V DC Bias=1.780uF, Capacitance @ 3.3V DC Bias=1.490uF, Capacitance @ 3.7V DC Bias=1.365uF, Capacitance @ 4.2V DC Bias=1.230uF, Capacitance @ 5V DC Bias=1.046uF, Capacitance @ 9V DC Bias=0.530uF, Capacitance @ 12V DC Bias=0.397uF, Capacitance @ 15V DC Bias=0.295uF, JLCPCB Basic Part=Yes, JLCPCB Part Number=C23630, Manufacturer="Samsung Electro-Mechanics", Package Size=0603, Temperature Coefficient=X5R, Temperature Rating="-55°C ~ 85°C", Tolerance=±10%, Voltage Rating=16V, Category="Capacitors - MLCC", ComponentLink1Description=Datasheet, ComponentLink1URL=https://wmsc.lcsc.com/wmsc/upload/file/pdf/v2/lcsc/2304140030_Samsung-Electro-Mechanics-CL10A225KO8NNNC_C23630.pdf, ComponentLink2Description="JLCPCB Part URL", ComponentLink2URL=https://jlcpcb.com/partdetail/C23630, ComponentLink3Description="LCSC Part URL", ComponentLink3URL=https://lcsc.com/product-detail/Multilayer-Ceramic-Capacitors-MLCC---SMD-SMT_Samsung-Electro-Mechanics-Samsung-Electro-Mechanics-CL10A225KO8NNNC_C23630.html, ComponentLink4Description="Samsung Component Library", ComponentLink4URL=https://weblib.samsungsem.com/mlcc/mlcc-ec.do?partNumber=CL10A225KO8NNN, Impedance (0V Bias) @ 1GHz=1.17Ω, Impedance (0V Bias) @ 1kHz=79.1Ω, Impedance (0V Bias) @ 1MHz=0.0866Ω, Impedance (0V Bias) @ 2GHz=2.75Ω, Impedance (0V Bias) @ 5GHz=5.64Ω, Impedance (0V Bias) @ 5kHz=16.4Ω, Impedance (0V Bias) @ 5MHz=0.00777Ω, Impedance (0V Bias) @ 10kHz=8.3Ω, Impedance (0V Bias) @ 10MHz=0.0257Ω, Impedance (0V Bias) @ 50kHz=1.7Ω, Impedance (0V Bias) @ 50MHz=0.0946Ω, Impedance (0V Bias) @ 100Hz=748Ω, Impedance (0V Bias) @ 100kHz=0.86Ω, Impedance (0V Bias) @ 100MHz=0.166Ω, Impedance (0V Bias) @ 500Hz=156Ω, Impedance (0V Bias) @ 500kHz=0.176Ω, Impedance (0V Bias) @ 500MHz=0.651Ω, Impedance (16V Bias) @ 1GHz=1.23Ω, Impedance (16V Bias) @ 1kHz=539Ω, Impedance (16V Bias) @ 1MHz=0.552Ω, Impedance (16V Bias) @ 2GHz=2.87Ω, Impedance (16V Bias) @ 5GHz=5.6Ω, Impedance (16V Bias) @ 5kHz=109Ω, Impedance (16V Bias) @ 5MHz=0.113Ω, Impedance (16V Bias) @ 10kHz=54.9Ω, Impedance (16V Bias) @ 10MHz=0.036Ω, Impedance (16V Bias) @ 50kHz=11.1Ω, Impedance (16V Bias) @ 50MHz=0.0879Ω, Impedance (16V Bias) @ 100Hz=5.28E+03Ω, Impedance (16V Bias) @ 100kHz=5.57Ω, Impedance (16V Bias) @ 100MHz=0.169Ω, Impedance (16V Bias) @ 500Hz=1.07E+03Ω, Impedance (16V Bias) @ 500kHz=1.12Ω, Impedance (16V Bias) @ 500MHz=0.683Ω, Manufacturer Part Number=CL10A225KO8NNNC, RoHS=Yes, Supplier 1=LCSC, Supplier Part Number 1=C23630
C16 C17: library part CC0603MRX5R8BB106, "CC0603MRX5R8BB106", Manufacturer_Name="Yageo Group", Mouser Part Number=603-CC0603MRX58BB106, Arrow Part Number=CC0603MRX5R8BB106, Arrow Price/Stock=https://www.arrow.com/en/products/cc0603mrx5r8bb106/yageo?utm_currency=USD&region=nac, Datasheet Link=https://datasheet.lcsc.com/lcsc/2006091816_YAGEO-CC0603MRX5R8BB106_C596327.pdf, Height=0.9mm, Manufacturer_Part_Number=CC0603MRX5R8BB106, Mouser Price/Stock=https://www.mouser.co.uk/ProductDetail/YAGEO/CC0603MRX5R8BB106?qs=tS%2FAHvPQ%2F55gSn%252B6nl2qbw%3D%3D
C20 C21 C22: library part EEH-ZA1V151P, "Capacitor Polarised, EEH-ZA1V151P", Manufacturer_Name=Panasonic, Mouser Part Number=667-EEH-ZA1V151P, Datasheet Link=http://industrial.panasonic.com/cdbs/www-data/pdf/RDD0000/ABA0000C1221.pdf, Height=10.8mm, Manufacturer_Part_Number=EEH-ZA1V151P, Mouser Price/Stock=https://www.mouser.co.uk/ProductDetail/Panasonic/EEH-ZA1V151P?qs=7UCyOFMWVHbEfsj1CtRV9Q%3D%3D
C32 C33 C34: "Capacitor, Ceramic (MLCC), 22nF, ±10%, 50V, X7R, ±10%, SMD 0603", Capacitance=22nF, Capacitance @ 1.2V DC Bias=22.636nF, Capacitance @ 1.5V DC Bias=22.733nF, Capacitance @ 1.8V DC Bias=22.823nF, Capacitance @ 1.35V DC Bias=22.685nF, Capacitance @ 1V DC Bias=22.573nF, Capacitance @ 2.5V DC Bias=22.946nF, Capacitance @ 3.3V DC Bias=23.004nF, Capacitance @ 3.7V DC Bias=23.013nF, Capacitance @ 4.2V DC Bias=23.008nF, Capacitance @ 5V DC Bias=22.974nF, Capacitance @ 9V DC Bias=22.838nF, Capacitance @ 12V DC Bias=22.650nF, Capacitance @ 15V DC Bias=22.427nF, Capacitance @ 24V DC Bias=21.437nF, Capacitance @ 36V DC Bias=19.554nF, Capacitance @ 48V DC Bias=17.020nF, JLCPCB Basic Part=Yes, JLCPCB Part Number=C21122, Manufacturer="Samsung Electro-Mechanics", Package Size=0603, Temperature Coefficient=X7R, Temperature Rating="-55°C ~ 125°C", Tolerance=±10%, Voltage Rating=50V, Category="Capacitors - MLCC", ComponentLink1Description=Datasheet, ComponentLink1URL=https://wmsc.lcsc.com/wmsc/upload/file/pdf/v2/lcsc/2304140030_Samsung-Electro-Mechanics-CL10B223KB8NNNC_C21122.pdf, ComponentLink2Description="JLCPCB Part URL", ComponentLink2URL=https://jlcpcb.com/partdetail/C21122, ComponentLink3Description="LCSC Part URL", ComponentLink3URL=https://lcsc.com/product-detail/Multilayer-Ceramic-Capacitors-MLCC---SMD-SMT_Samsung-Electro-Mechanics-Samsung-Electro-Mechanics-CL10B223KB8NNNC_C21122.html, ComponentLink4Description="Samsung Component Library", ComponentLink4URL=https://weblib.samsungsem.com/mlcc/mlcc-ec.do?partNumber=CL10B223KB8NNN, Impedance (0V Bias) @ 1GHz=1.65Ω, Impedance (0V Bias) @ 1kHz=7.64E+03Ω, Impedance (0V Bias) @ 1MHz=8.09Ω, Impedance (0V Bias) @ 2GHz=4.18Ω, Impedance (0V Bias) @ 5GHz=9.53Ω, Impedance (0V Bias) @ 5kHz=1.55E+03Ω, Impedance (0V Bias) @ 5MHz=1.63Ω, Impedance (0V Bias) @ 10kHz=779Ω, Impedance (0V Bias) @ 10MHz=0.801Ω, Impedance (0V Bias) @ 50kHz=158Ω, Impedance (0V Bias) @ 50MHz=0.0651Ω, Impedance (0V Bias) @ 100Hz=7.5E+04Ω, Impedance (0V Bias) @ 100kHz=79.4Ω, Impedance (0V Bias) @ 100MHz=0.206Ω, Impedance (0V Bias) @ 500Hz=1.52E+04Ω, Impedance (0V Bias) @ 500kHz=16.1Ω, Impedance (0V Bias) @ 500MHz=0.865Ω, Manufacturer Part Number=CL10B223KB8NNNC, RoHS=Yes, Supplier 1=LCSC, Supplier Part Number 1=C21122
C38 C39 C40: "Capacitor, Ceramic (MLCC), 4.7uF, ±10%, 16V, X5R, ±10%, SMD 0603", Capacitance=4.7uF, Capacitance @ 1.2V DC Bias=4.030uF, Capacitance @ 1.5V DC Bias=3.908uF, Capacitance @ 1.8V DC Bias=3.769uF, Capacitance @ 1.35V DC Bias=3.972uF, Capacitance @ 1V DC Bias=4.097uF, Capacitance @ 2.5V DC Bias=3.406uF, Capacitance @ 3.3V DC Bias=2.969uF, Capacitance @ 3.7V DC Bias=2.760uF, Capacitance @ 4.2V DC Bias=2.508uF, Capacitance @ 5V DC Bias=2.138uF, Capacitance @ 9V DC Bias=1.155uF, Capacitance @ 12V DC Bias=0.873uF, Capacitance @ 15V DC Bias=0.647uF, JLCPCB Basic Part=Yes, JLCPCB Part Number=C19666, Manufacturer="Samsung Electro-Mechanics", Package Size=0603, Temperature Coefficient=X5R, Temperature Rating="-55°C ~ 85°C", Tolerance=±10%, Voltage Rating=16V, Category="Capacitors - MLCC", ComponentLink1Description=Datasheet, ComponentLink1URL=https://wmsc.lcsc.com/wmsc/upload/file/pdf/v2/lcsc/2304140030_Samsung-Electro-Mechanics-CL10A475KO8NNNC_C19666.pdf, ComponentLink2Description="JLCPCB Part URL", ComponentLink2URL=https://jlcpcb.com/partdetail/C19666, ComponentLink3Description="LCSC Part URL", ComponentLink3URL=https://lcsc.com/product-detail/Multilayer-Ceramic-Capacitors-MLCC---SMD-SMT_Samsung-Electro-Mechanics-Samsung-Electro-Mechanics-CL10A475KO8NNNC_C19666.html, ComponentLink4Description="Samsung Component Library", ComponentLink4URL=https://weblib.samsungsem.com/mlcc/mlcc-ec.do?partNumber=CL10A475KO8NNN, Impedance (0V Bias) @ 1GHz=1.02Ω, Impedance (0V Bias) @ 1kHz=46Ω, Impedance (0V Bias) @ 1MHz=0.05Ω, Impedance (0V Bias) @ 2GHz=2.37Ω, Impedance (0V Bias) @ 5GHz=4.65Ω, Impedance (0V Bias) @ 5kHz=9.51Ω, Impedance (0V Bias) @ 5MHz=0.011Ω, Impedance (0V Bias) @ 10kHz=4.83Ω, Impedance (0V Bias) @ 10MHz=0.0248Ω, Impedance (0V Bias) @ 50kHz=0.996Ω, Impedance (0V Bias) @ 50MHz=0.0811Ω, Impedance (0V Bias) @ 100Hz=437Ω, Impedance (0V Bias) @ 100kHz=0.505Ω, Impedance (0V Bias) @ 100MHz=0.141Ω, Impedance (0V Bias) @ 500Hz=90.6Ω, Impedance (0V Bias) @ 500kHz=0.104Ω, Impedance (0V Bias) @ 500MHz=0.57Ω, Impedance (16V Bias) @ 1GHz=1.06Ω, Impedance (16V Bias) @ 1kHz=381Ω, Impedance (16V Bias) @ 1MHz=0.386Ω, Impedance (16V Bias) @ 2GHz=2.36Ω, Impedance (16V Bias) @ 5GHz=4.63Ω, Impedance (16V Bias) @ 5kHz=77.1Ω, Impedance (16V Bias) @ 5MHz=0.077Ω, Impedance (16V Bias) @ 10kHz=38.7Ω, Impedance (16V Bias) @ 10MHz=0.0173Ω, Impedance (16V Bias) @ 50kHz=7.82Ω, Impedance (16V Bias) @ 50MHz=0.0836Ω, Impedance (16V Bias) @ 100Hz=3.74E+03Ω, Impedance (16V Bias) @ 100kHz=3.93Ω, Impedance (16V Bias) @ 100MHz=0.142Ω, Impedance (16V Bias) @ 500Hz=758Ω, Impedance (16V Bias) @ 500kHz=0.79Ω, Impedance (16V Bias) @ 500MHz=0.585Ω, Manufacturer Part Number=CL10A475KO8NNNC, RoHS=Yes, Supplier 1=LCSC, Supplier Part Number 1=C19666
D1: "Schottky Diode", Manufacturer_Name=onsemi, Mouser Part Number=512-SS24FL, Arrow Part Number=SS24FL, Arrow Price/Stock=https://www.arrow.com/en/products/ss24fl/on-semiconductor.html?utm_currency=USD&region=asia, Datasheet Link=https://www.onsemi.com/pub/Collateral/SS26FL-D.PDF, Height=1.08mm, Manufacturer_Part_Number=SS24FL, Mouser Price/Stock=https://www.mouser.co.uk/ProductDetail/onsemi-Fairchild/SS24FL?qs=tqW9UTzndZyvT5hdH%252BfSxg%3D%3D
D2: Manufacturer_Name=STMicroelectronics, Datasheet Link=https://www.st.com/resource/en/datasheet/smbj12a.pdf, Height=2.45mm, Manufacturer_Part_Number=SMBJ22A
D3: "CUS05S40,H3F, Schottky Diode", Manufacturer_Name=Toshiba, Mouser Part Number=757-CUS05S40H3F, Arrow Part Number=CUS05S40,H3F, Arrow Price/Stock=https://www.arrow.com/en/products/cus05s40h3f/toshiba?utm_currency=USD&region=nac, Datasheet Link=http://toshiba.semicon-storage.com/info/docget.jsp?did=14743&prodName=CUS05S40, Height=1.1mm, Manufacturer_Part_Number=CUS05S40,H3F, Mouser Price/Stock=https://www.mouser.co.uk/ProductDetail/Toshiba/CUS05S40H3F?qs=cW4DzVrAanNdPcmUvyvUwQ%3D%3D
D4 D5 D6: "TVS Diode (Uni-directional)", Manufacturer_Name=STMicroelectronics, Datasheet Link=https://www.st.com/resource/en/datasheet/smbj12a.pdf, Height=2.45mm, Manufacturer_Part_Number=SMBJ22A
IC1: "Integrated Circuit", Manufacturer_Name="Espressif Systems", Mouser Part Number=356-ESP32-S3WROOM1N4, Datasheet Link=https://www.espressif.com/sites/default/files/documentation/esp32-s3-wroom-1_wroom-1u_datasheet_en.pdf, Height=3.25mm, Manufacturer_Part_Number=ESP32-S3-WROOM-1-N4, Mouser Price/Stock=https://www.mouser.co.uk/ProductDetail/Espressif-Systems/ESP32-S3-WROOM-1-N4?qs=Li%252BoUPsLEnsO%2FkiJOUK0FQ%3D%3D
IC2: "Integrated Circuit", Manufacturer_Name=STMicroelectronics, Mouser Part Number=511-LSM6DSV16BXTR, Arrow Part Number=LSM6DSV16BXTR, Arrow Price/Stock=https://www.arrow.com/en/products/lsm6dsv16bxtr/stmicroelectronics?utm_currency=USD&region=nac, Datasheet Link=https://www.st.com/resource/en/datasheet/lsm6dsv16bx.pdf, Height=0.74mm, Manufacturer_Part_Number=LSM6DSV16BXTR, Mouser Price/Stock=https://www.mouser.co.uk/ProductDetail/STMicroelectronics/LSM6DSV16BXTR?qs=vvQtp7zwQdMXKB4RqH7GHQ%3D%3D
IC3: "buck converter, 3A 4V~36V input to 1V~28V output", Manufacturer_Name="Texas Instruments", Mouser Part Number=595-LMR23630AFDDAR, Arrow Part Number=LMR23630AFDDAR, Arrow Price/Stock=https://www.arrow.com/en/products/lmr23630afddar/texas-instruments?utm_currency=USD&region=europe, Datasheet Link=http://www.ti.com/lit/ds/symlink/lmr23630.pdf, Height=1.7mm, Manufacturer_Part_Number=LMR23630AFDDAR, Mouser Price/Stock=https://www.mouser.co.uk/ProductDetail/Texas-Instruments/LMR23630AFDDAR?qs=8%2FmU9qzJpL918w7tcTwARg%3D%3D
IC4 IC5 IC6: "Integrated Circuit", Manufacturer_Name="Analog Devices", Mouser Part Number=700-TMC2209-LA-T, Arrow Part Number=TMC2209-LA-T, Arrow Price/Stock=https://www.arrow.com/en/products/tmc2209-la-t/analog-devices.html?utm_currency=USD&region=nac, Datasheet Link=https://www.analog.com/media/en/technical-documentation/data-sheets/TMC2209_datasheet_rev1.09.pdf, Height=0.9mm, Manufacturer_Part_Number=TMC2209-LA-T, Mouser Price/Stock=https://www.mouser.co.uk/ProductDetail/ADI-Trinamic/TMC2209-LA-T?qs=TiOZkKH1s2Qz5AVGoa6OOQ%3D%3D
J1: "Connector", Manufacturer_Name="Wurth Elektronik", Mouser Part Number=710-691137710002, Datasheet Link=https://www.we-online.com/catalog/datasheet/691137710002.pdf, Height=11.5mm, Manufacturer_Part_Number=691137710002, Mouser Price/Stock=https://www.mouser.co.uk/ProductDetail/Wurth-Elektronik/691137710002?qs=lBTPRtX1sU9LnHBbviNKGA%3D%3D
J2: "Connector", Manufacturer_Name="Amphenol Communications Solutions", Arrow Part Number=GSB1C41110SSHR, Arrow Price/Stock=https://www.arrow.com/en/products/gsb1c41110sshr/amphenol-fci.html?utm_currency=USD&region=asia, Datasheet Link=https://cdn.amphenol-cs.com/media/wysiwyg/files/drawing/gsb1c41x10sshr-ax1.pdf, Height=3.41mm, Manufacturer_Part_Number=GSB1C41110SSHR
J3 J4 J5: "4-Pin Right Angle Nanofit", Manufacturer_Name=Molex, Mouser Part Number=538-105313-1104, Datasheet Link=http://www.molex.com/webdocs/datasheets/pdf/en-us//1053131104_PCB_HEADERS.pdf, Height=6.84mm, Manufacturer_Part_Number=105313-1104, Mouser Price/Stock=https://www.mouser.co.uk/ProductDetail/Molex/105313-1104?qs=PqFvFmEiOr4uJzhImSsntA%3D%3D
J6 J7: "Connector", Manufacturer_Name="Same Sky", Datasheet Link=https://www.sameskydevices.com/product/resource/ssk02-fph-254.pdf, Height=8.7mm, Manufacturer_Part_Number=SSK02-FPH-254-A24
L1: library part SRP6540-100M, "Inductor", Manufacturer_Name=Bourns, Mouser Part Number=652-SRP6540-100M, Arrow Part Number=SRP6540-100M, Arrow Price/Stock=https://www.arrow.com/en/products/srp6540-100m/bourns?region=nac, Datasheet Link=https://www.bourns.com/docs/Product-Datasheets/SRP6540.pdf, Manufacturer_Part_Number=SRP6540-100M, Mouser Price/Stock=https://www.mouser.co.uk/ProductDetail/Bourns/SRP6540-100M?qs=Zq5ylnUbLm4Q0Lm%2FnNPHig%3D%3D
R1: "Resistor, 200Ω, ±1%, 100mW, 75V, ±100ppm/℃, -55℃~+155℃, SMD 0603", JLCPCB Basic Part=Yes, JLCPCB Part Number=C8218, Manufacturer=Uniroyal, Package Size=0603, Power Rating=100mW, Resistance=200Ω, Temperature Coefficient=±100ppm/℃, Temperature Rating=-55℃~+155℃, Tolerance=±1%, Voltage Rating=75V, Category=Resistors, ComponentLink1Description=Datasheet, ComponentLink1URL=https://wmsc.lcsc.com/wmsc/upload/file/pdf/v2/lcsc/2206010216_UNI-ROYAL-Uniroyal-Elec-0603WAF2000T5E_C8218.pdf, ComponentLink2Description="JLCPCB Part URL", ComponentLink2URL=https://jlcpcb.com/partdetail/C8218, Manufacturer Part Number=0603WAF2000T5E, Supplier 1=LCSC, Supplier Part Number 1=C8218
R2 R3 R5: "Resistor, 10kΩ, ±1%, 100mW, 75V, ±100ppm/℃, -55℃~+155℃, SMD 0603", JLCPCB Basic Part=Yes, JLCPCB Part Number=C25804, Manufacturer=Uniroyal, Package Size=0603, Power Rating=100mW, Resistance=10kΩ, Temperature Coefficient=±100ppm/℃, Temperature Rating=-55℃~+155℃, Tolerance=±1%, Voltage Rating=75V, Category=Resistors, ComponentLink1Description=Datasheet, ComponentLink1URL=https://wmsc.lcsc.com/wmsc/upload/file/pdf/v2/lcsc/2206010045_UNI-ROYAL-Uniroyal-Elec-0603WAF1002T5E_C25804.pdf, ComponentLink2Description="JLCPCB Part URL", ComponentLink2URL=https://jlcpcb.com/partdetail/C25804, Manufacturer Part Number=0603WAF1002T5E, Supplier 1=LCSC, Supplier Part Number 1=C25804
R4 R9: "Resistor, 1kΩ, ±1%, 100mW, 75V, ±100ppm/℃, -55℃~+155℃, SMD 0603", JLCPCB Basic Part=Yes, JLCPCB Part Number=C21190, Manufacturer=Uniroyal, Package Size=0603, Power Rating=100mW, Resistance=1kΩ, Temperature Coefficient=±100ppm/℃, Temperature Rating=-55℃~+155℃, Tolerance=±1%, Voltage Rating=75V, Category=Resistors, ComponentLink1Description=Datasheet, ComponentLink1URL=https://wmsc.lcsc.com/wmsc/upload/file/pdf/v2/lcsc/2206010130_UNI-ROYAL-Uniroyal-Elec-0603WAF1001T5E_C21190.pdf, ComponentLink2Description="JLCPCB Part URL", ComponentLink2URL=https://jlcpcb.com/partdetail/C21190, Manufacturer Part Number=0603WAF1001T5E, Supplier 1=LCSC, Supplier Part Number 1=C21190
R6 R7: "Resistor, 22Ω, ±1%, 100mW, 75V, ±100ppm/℃, -55℃~+155℃, SMD 0603", JLCPCB Basic Part=Yes, JLCPCB Part Number=C23345, Manufacturer=Uniroyal, Package Size=0603, Power Rating=100mW, Resistance=22Ω, Temperature Coefficient=±100ppm/℃, Temperature Rating=-55℃~+155℃, Tolerance=±1%, Voltage Rating=75V, Category=Resistors, ComponentLink1Description=Datasheet, ComponentLink1URL=https://wmsc.lcsc.com/wmsc/upload/file/pdf/v2/lcsc/2206010100_UNI-ROYAL-Uniroyal-Elec-0603WAF220JT5E_C23345.pdf, ComponentLink2Description="JLCPCB Part URL", ComponentLink2URL=https://jlcpcb.com/partdetail/C23345, Manufacturer Part Number=0603WAF220JT5E, Supplier 1=LCSC, Supplier Part Number 1=C23345
R8 R10: "Resistor, 2.2kΩ, ±1%, 100mW, 75V, ±100ppm/℃, -55℃~+155℃, SMD 0603", JLCPCB Basic Part=Yes, JLCPCB Part Number=C4190, Manufacturer=Uniroyal, Package Size=0603, Power Rating=100mW, Resistance=2.2kΩ, Temperature Coefficient=±100ppm/℃, Temperature Rating=-55℃~+155℃, Tolerance=±1%, Voltage Rating=75V, Category=Resistors, ComponentLink1Description=Datasheet, ComponentLink1URL=https://wmsc.lcsc.com/wmsc/upload/file/pdf/v2/lcsc/2206010230_UNI-ROYAL-Uniroyal-Elec-0603WAF2201T5E_C4190.pdf, ComponentLink2Description="JLCPCB Part URL", ComponentLink2URL=https://jlcpcb.com/partdetail/C4190, Manufacturer Part Number=0603WAF2201T5E, Supplier 1=LCSC, Supplier Part Number 1=C4190
R13: library part RT0603BRD076K9L, "RES SMD 6.9K OHM 0.1% 1/10W 0603", ComponentLink1Description="New link", ComponentLink1URL=https://yageogroup.com/content/datasheet/asset/file/PYU-RT_1-TO-0-01_ROHS_L
R14: library part RT0603BRD073K97L, "RES SMD 3.97KOHM 0.1% 1/10W 0603", ComponentLink1Description="New link", ComponentLink1URL=https://yageogroup.com/content/datasheet/asset/file/PYU-RT_1-TO-0-01_ROHS_L
R15 R16 R17 R18 R19 R20: library part PE0603FRF470R22L, "RES 0.22 OHM 1% 2/5W 0603"
R21 R22: "Resistor, 5.1kΩ, ±1%, 100mW, 75V, ±100ppm/℃, -55℃~+155℃, SMD 0603", JLCPCB Basic Part=Yes, JLCPCB Part Number=C23186, Manufacturer=Uniroyal, Package Size=0603, Power Rating=100mW, Resistance=5.1kΩ, Temperature Coefficient=±100ppm/℃, Temperature Rating=-55℃~+155℃, Tolerance=±1%, Voltage Rating=75V, Category=Resistors, ComponentLink1Description=Datasheet, ComponentLink1URL=https://wmsc.lcsc.com/wmsc/upload/file/pdf/v2/lcsc/2206010116_UNI-ROYAL-Uniroyal-Elec-0603WAF5101T5E_C23186.pdf, ComponentLink2Description="JLCPCB Part URL", ComponentLink2URL=https://jlcpcb.com/partdetail/C23186, Manufacturer Part Number=0603WAF5101T5E, Supplier 1=LCSC, Supplier Part Number 1=C23186
S1: "Switch", Manufacturer_Name="Same Sky", Mouser Part Number=179-TS0925WT260SMTTR, Arrow Part Number=TS09-63-25-WT-260-SMT-TR, Arrow Price/Stock=https://www.arrow.com/en/products/ts09-63-25-wt-260-smt-tr/cui-devices?utm_currency=USD&region=nac, Datasheet Link=https://www.sameskydevices.com/product/resource/ts09.pdf, Height=2.7mm, Manufacturer_Part_Number=TS09-63-25-WT-260-SMT-TR, Mouser Price/Stock=https://www.mouser.co.uk/ProductDetail/Same-Sky/TS09-63-25-WT-260-SMT-TR?qs=Rp5uXu7WBW9IcFK5UTCCFQ%3D%3D
S2: Manufacturer_Name="Same Sky", Mouser Part Number=179-TS0925WT260SMTTR, Arrow Part Number=TS09-63-25-WT-260-SMT-TR, Arrow Price/Stock=https://www.arrow.com/en/products/ts09-63-25-wt-260-smt-tr/cui-devices?utm_currency=USD&region=nac, Datasheet Link=https://www.sameskydevices.com/product/resource/ts09.pdf, Height=2.7mm, Manufacturer_Part_Number=TS09-63-25-WT-260-SMT-TR, Mouser Price/Stock=https://www.mouser.co.uk/ProductDetail/Same-Sky/TS09-63-25-WT-260-SMT-TR?qs=Rp5uXu7WBW9IcFK5UTCCFQ%3D%3D
TP1 TP2 TP3: "Keyston Electronics 5001 Test Point Loop", Color=Black, Manufacturer="Keystone Electronics", Manufacturer P/N=5001, Supplier Part Number 1=36-5001-ND, Supplier 1=Digi-Key
U1: library part CMP-0395-00366-2, "Single Output Fast Transient Response LDO, 1.5 A, Adjustable 1.21 to 20 V Output, 2.1 to 20 V Input, 6-pin SOT-223 (DCQ), -40 to 125 degC, Green (RoHS & no Sb/Br)", Manufacturer="Texas Instruments", ComponentLink1Description="Manufacturer URL", ComponentLink1URL=http://www.ti.com/, ComponentLink2Description=Datasheet, ComponentLink2URL=http://www.ti.com/general/docs/lit/getliterature.tsp?genericPartNumber=TL1963A&fileType=pdf, ComponentLink3Description="Package Specification", ComponentLink3URL=http://www.ti.com/litv/pdf/mpds098c, DatasheetVersion=SLVS719F, Eco-Plan="Green (RoHS & no Sb/Br)", Iout(Max)(A)=1.5, Iq(Typ)(mA)=1, Mounting Technology="Surface Mount", PackageDescription="6-Pin Plastic Small Outline, Body 3.5 x 6.5 mm, Pitch 1.27 mm", PackageReference=DCQ0006A, PackageVersion=4202109/D, PartNumber=TL1963ADCQR, SubFamily="Single Channel LDO", Vdo(Typ)(mV)=340, Vin(Max)(V)=20, Vin(Min)(V)=2.1, Vout Adj(Max)(V)=20, Vout Adj(Min)(V)=1.21

## Via types
v1: diameter 20, hole 10, Top Layer to Bottom Layer, tented both sides, 7 vias

## Nets (pads, with @x,y where several pads share a name; then routed paths per layer and width w, separated by ;. In a path a pad name is that pad's centre, name@x,y a point inside that pad or via, vN(x,y) a via of type N, cw(c..) or ccw(c..) an arc to the next point about the centre after c; other vN are vias at no path point)
3V3: C1.2 C2.2 C7.2 C8.2 C9.1 C10.1 C17.1 C35.1 C36.1 C37.1 IC1.2 IC2.5 IC2.8 IC2.12 IC4.15 IC5.9 IC5.15 IC6.10 IC6.15 R1.2 R2.2 R3.2 R5.1 R8.1 R10.1 R13.2 TP1.1 U1.4
5V4: C13.2 C14.1 C16.1 D3.2 L1.2 R9.2 TP2.1 U1.1 U1.2
CS: IC1.32 J6.12
Data_Ready: IC1.33 J6.13
DIAG1: IC1.4 IC4.11
DIAG2: IC1.5 IC5.11
DIAG3: IC1.6 IC6.11
DIR1: IC4.19 J7.12
DIR2: IC5.19 J7.14
DIR3: IC6.19 J7.17
ENN: IC1.34 IC4.2 IC5.2 IC6.2 R5.2
GND: C1.1 C2.1 C3.1 C4.1 C5.1 C6.1 C7.1 C8.1 C9.2 C10.2 C12.2 C14.2 C15.1 C16.2 C17.2 C20.2 C21.2 C22.2 C23.1 C24.1 C25.1 C26.1 C27.1 C28.1 C35.2 C36.2 C37.2 C38.1 C39.1 C40.1 D2.2 D4.2 D5.2 D6.2 IC1.1 IC1.40 IC1.41 IC1.42 IC1.43 IC1.44 IC1.45 IC1.46 IC1.47 IC1.48 IC1.49 IC2.1 IC2.2 IC2.3 IC2.6 IC2.7 IC2.9 IC3.6 IC3.8 IC3.9 IC4.3 IC4.7 IC4.9 IC4.10 IC4.13 IC4.18 IC4.20 IC4.29 IC5.3 IC5.7 IC5.10 IC5.13 IC5.18 IC5.20 IC5.29 IC6.3 IC6.7 IC6.9 IC6.13 IC6.18 IC6.20 IC6.29 J1.1 J2.A1 J2.A12 J2.MP1 J2.MP2 J2.MP3 J2.MP4 J6.7 J7.1 J7.10 LED1.1 LED2.1 R14.1 R15.2 R16.2 R17.2 R18.2 R19.2 R20.2 R21.2 R22.1 S1.2 S2.2 TP3.1 U1.3 U1.6 | length 707.1
  Top Layer w10: J2.MP2 2335,5860.28 2335,5935 J2.MP4 ; v1(2395,5710) R21.2 ; v1(2395,5765) 2428.78,5765 2450.59,5786.81 J2.A12 ; R22.1 v1(2755,5710) ; J2.A1 2702.56,5786.81 2725,5764.37 2754.37,5764.37 v1(2755,5765) ; J2.MP1 2820,5862.13 v1@2820,5894.29 ; J2.MP3 2820,5933.15 v1(2820,5895) ; v1(3155,5795) 3229.63,5795 IC1.1
  other v1: 2335,5895
INT1: IC1.19 IC2.4
NetC3_2: C3.2 C4.2 IC1.3 R3.1 S2.1
NetC11_1: C11.1 IC3.1 L1.1
NetC11_2: C11.2 IC3.2
NetC13_1: C13.1 IC3.4
NetC15_2: C15.2 IC3.3
NetC29_1: C29.1 IC4.6
NetC30_1: C30.1 IC5.6
NetC31_1: C31.1 IC6.6
NetC32_1: C32.1 IC4.5
NetC32_2: C32.2 IC4.4
NetC33_1: C33.1 IC5.5
NetC33_2: C33.2 IC5.4
NetC34_1: C34.1 IC6.5
NetC34_2: C34.2 IC6.4
NetC38_2: C38.2 IC5.8
NetC39_2: C39.2 IC6.8
NetC40_2: C40.2 IC4.8
NetD3_1: D3.1 J7.8
NetIC1_10: IC1.10 R4.2
NetIC1_13: IC1.13 R6.2
NetIC1_14: IC1.14 R7.2
NetIC1_27: IC1.27 R2.1 S1.1
NetIC4_23: IC4.23 R18.1
NetIC4_27: IC4.27 R15.1
NetIC5_23: IC5.23 R19.1
NetIC5_27: IC5.27 R16.1
NetIC6_23: IC6.23 R20.1
NetIC6_27: IC6.27 R17.1
NetJ2_A5: J2.A5 R22.2 | length 90.4
  Top Layer w10: J2.A5 2626.69,5796.73 2626.69,5715.75 R22.2
NetJ2_B5: J2.B5 R21.1 | length 87.7
  Top Layer w10: R21.1 2507.62,5710.06 2507.62,5797.58 J2.B5
NetLED1_2: LED1.2 R1.1
NetLED2_2: LED2.2 R9.1
NetR13_1: R13.1 R14.2 U1.5
OA1_1: IC4.24 J3.4
OA1_2: IC5.24 J4.4
OA1_3: IC6.24 J5.4
OA2_1: IC4.21 J3.3
OA2_2: IC5.21 J4.3
OA2_3: IC6.21 J5.3
OB1_1: IC4.26 J3.2
OB1_2: IC5.26 J4.2
OB1_3: IC6.26 J5.2
OB2_1: IC4.1 J3.1
OB2_2: IC5.1 J4.1
OB2_3: IC6.1 J5.1
PICO: IC1.30 J6.10
POCI: IC1.31 J6.11
SCK: IC1.29 J6.9
SCL: IC1.21 IC2.13 R10.2
SDA: IC1.20 IC2.14 R8.2
STEP1: IC4.16 J7.11
STEP2: IC5.16 J7.13
STEP3: IC6.16 J7.15